# Altium PCB PB-PCB1.PcbDoc (part 4 of 4)
Units mm, origin at the board's own origin, x right, y up, seen from the top; angles counter-clockwise.
Board outline 179 x 85 mm, 2 copper layers (Top Layer, Bottom Layer); 468 components, 249 nets, 1291 pads, 562 vias.
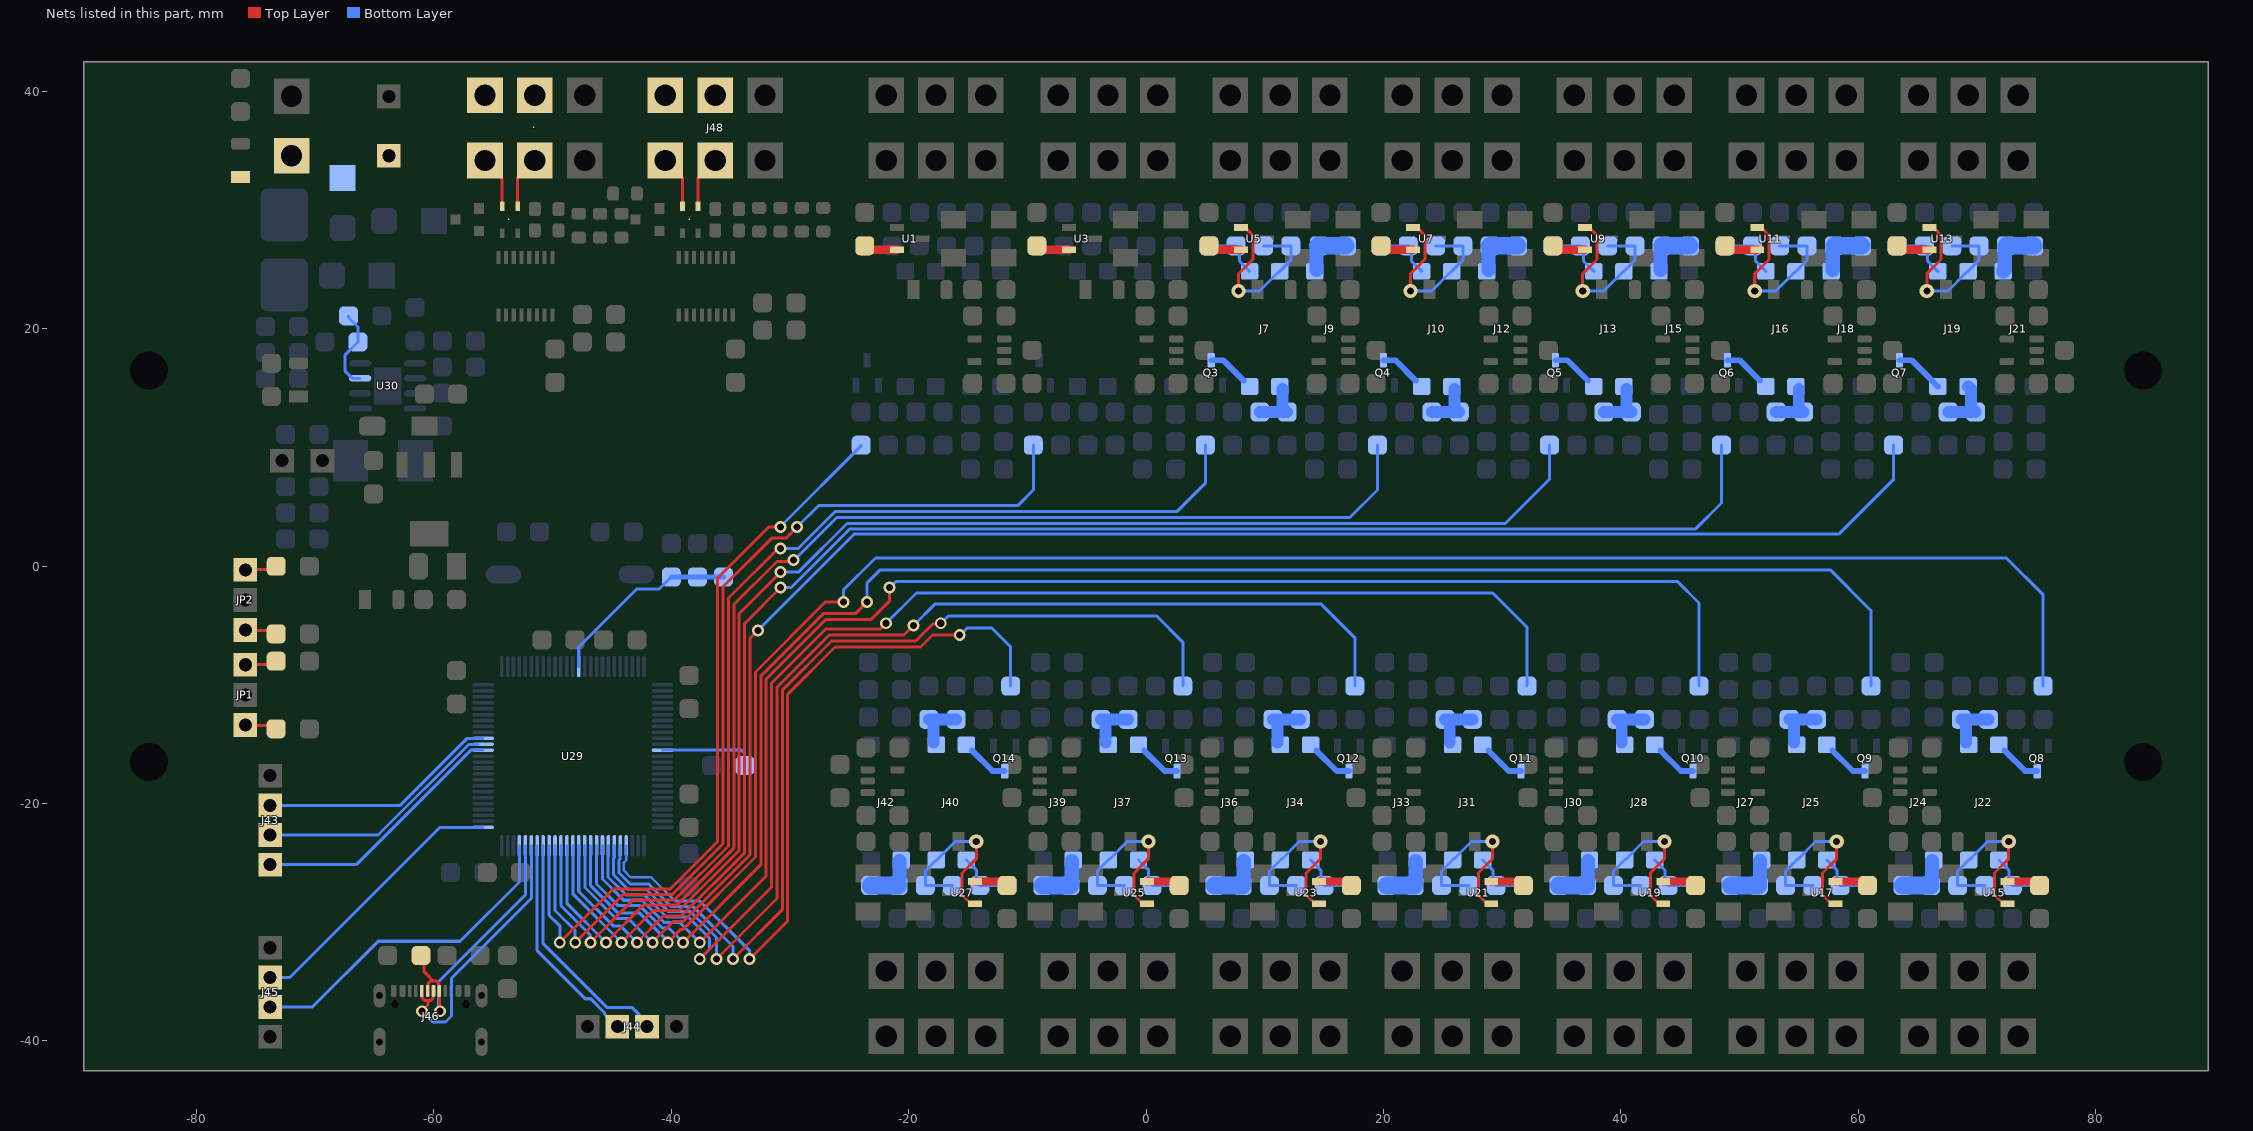
[diagram p3: the nets of this part, all layers, seen from the top]

## Via types
v1: diameter 1, hole 0.6, Top Layer to Bottom Layer, tented both sides, 509 vias
v2: diameter 1.2, hole 0.6, Top Layer to Bottom Layer, tented both sides, 39 vias
v3: diameter 1.27, hole 0.6, Top Layer to Bottom Layer, tented both sides, 14 vias

## Nets (pads, with @x,y where several pads share a name; then routed paths per layer and width w, separated by ;. In a path a pad name is that pad's centre, name@x,y a point inside that pad or via, vN(x,y) a via of type N, cw(c..) or ccw(c..) an arc to the next point about the centre after c; other vN are vias at no path point) (continued)
NetJ7_1: J7.1 R34.1 R35.1 | length 3.8
  Bottom Layer w1: R34.1@9.6,13 R35.1@11.9,13 ; R35.1@11.505,13.395 J7.1@11.505,14.945
NetJ7_2: J7.2 Q3.3 | length 3.5
  Bottom Layer w0.5: Q3.3@5.5,17.36 6.52,17.36 J7.2@8.245,15.635
NetJ7_3: J7.3 R36.1 R37.1 | length 4.9
  Bottom Layer w0.254: R36.1@5.3,27 R37.1@7.6,27 7.873,26.727 7.873,25.707 8.152,25.428 8.152,25.424 8.727,24.85 J7.3@8.73,24.85
NetJ7_4: J7.4 R32.2 R33.2 U5.1 | length 14.8
  Top Layer w0.254: v2(7.797,23.2) 7.797,24.651 8.997,25.851 8.997,27.903 U5.1@8.495,28.405
  Bottom Layer w0.254: v2(7.797,23.2) 9.573,23.2 J7.4@11.123,24.75 ; R32.2@9.9,27 R33.2@12.2,27 12.2,25.777 11.273,24.85 J7.4@11.27,24.85 J7.4@11.2,24.78
NetJ9_1: J9.1 R42.1 R43.1 | length 4.2
  Bottom Layer w1.2: J9.1@14.365,24.955 R42.1@14.365,26.865
  Bottom Layer w1.5: R42.1@14.5,27 R43.1@16.8,27
NetJ10_1: J10.1 R49.1 R50.1 | length 3.8
  Bottom Layer w1: R49.1@24.1,13 R50.1@26.4,13 ; R50.1@26.005,13.395 J10.1@26.005,14.945
NetJ10_2: J10.2 Q4.3 | length 3.5
  Bottom Layer w0.5: Q4.3@20,17.36 21.02,17.36 J10.2@22.745,15.635
NetJ10_3: J10.3 R51.1 R52.1 | length 4.9
  Bottom Layer w0.254: R51.1@19.8,27 R52.1@22.1,27 22.373,26.727 22.373,25.707 22.652,25.428 22.652,25.424 23.227,24.85 J10.3@23.23,24.85
NetJ10_4: J10.4 R47.2 R48.2 U7.1 | length 14.8
  Top Layer w0.254: v2(22.297,23.2) 22.297,24.651 23.497,25.851 23.497,27.903 U7.1@22.995,28.405
  Bottom Layer w0.254: v2(22.297,23.2) 24.073,23.2 J10.4@25.623,24.75 ; R47.2@24.4,27 R48.2@26.7,27 26.7,25.777 25.773,24.85 J10.4@25.77,24.85 J10.4@25.7,24.78
NetJ12_1: J12.1 R57.1 R58.1 | length 4.2
  Bottom Layer w1.2: J12.1@28.865,24.955 R57.1@28.865,26.865
  Bottom Layer w1.5: R57.1@29,27 R58.1@31.3,27
NetJ13_1: J13.1 R64.1 R65.1 | length 3.8
  Bottom Layer w1: R64.1@38.6,13 R65.1@40.9,13 ; R65.1@40.505,13.395 J13.1@40.505,14.945
NetJ13_2: J13.2 Q5.3 | length 3.5
  Bottom Layer w0.5: Q5.3@34.5,17.36 35.52,17.36 J13.2@37.245,15.635
NetJ13_3: J13.3 R66.1 R67.1 | length 4.9
  Bottom Layer w0.254: R66.1@34.3,27 R67.1@36.6,27 36.873,26.727 36.873,25.707 37.152,25.428 37.152,25.424 37.727,24.85 J13.3@37.73,24.85
NetJ13_4: J13.4 R62.2 R63.2 U9.1 | length 14.8
  Top Layer w0.254: v2(36.8,23.2) 36.8,24.651 38,25.851 38,27.903 U9.1@37.499,28.405
  Bottom Layer w0.254: v2(36.8,23.2) 38.577,23.2 J13.4@40.127,24.75 ; R62.2@38.9,27 R63.2@41.2,27 41.2,25.777 40.273,24.85 J13.4@40.27,24.85 J13.4@40.2,24.78
NetJ15_1: J15.1 R72.1 R73.1 | length 4.2
  Bottom Layer w1.2: J15.1@43.365,24.955 R72.1@43.365,26.865
  Bottom Layer w1.5: R72.1@43.5,27 R73.1@45.8,27
NetJ16_1: J16.1 R79.1 R80.1 | length 3.8
  Bottom Layer w1: R79.1@53.1,13 R80.1@55.4,13 ; R80.1@55.005,13.395 J16.1@55.005,14.945
NetJ16_2: J16.2 Q6.3 | length 3.5
  Bottom Layer w0.5: Q6.3@49,17.36 50.02,17.36 J16.2@51.745,15.635
NetJ16_3: J16.3 R81.1 R82.1 | length 4.9
  Bottom Layer w0.254: R81.1@48.8,27 R82.1@51.1,27 51.373,26.727 51.373,25.707 51.652,25.428 51.652,25.424 52.227,24.85 J16.3@52.23,24.85
NetJ16_4: J16.4 R77.2 R78.2 U11.1 | length 14.8
  Top Layer w0.254: v2(51.297,23.2) 51.297,24.651 52.497,25.851 52.497,27.903 U11.1@51.995,28.405
  Bottom Layer w0.254: v2(51.297,23.2) 53.073,23.2 J16.4@54.623,24.75 ; R77.2@53.4,27 R78.2@55.7,27 55.7,25.777 54.773,24.85 J16.4@54.77,24.85 J16.4@54.7,24.78
NetJ18_1: J18.1 R87.1 R88.1 | length 4.2
  Bottom Layer w1.2: J18.1@57.865,24.955 R87.1@57.865,26.865
  Bottom Layer w1.5: R87.1@58,27 R88.1@60.3,27
NetJ19_1: J19.1 R94.1 R95.1 | length 4.7
  Bottom Layer w1: R94.1@67.6,13 R95.1@69.9,13 69.505,13.395 69.505,14.945 69.3,15.15 J19.1@69.27,15.15
NetJ19_2: J19.2 Q7.3 | length 4.2
  Bottom Layer w0.5: Q7.3@63.5,17.36 64.52,17.36 66.245,15.635 66.245,15.605 66.7,15.15 J19.2@66.73,15.15
NetJ19_3: J19.3 R96.1 R97.1 | length 4.9
  Bottom Layer w0.254: R96.1@63.3,27 R97.1@65.6,27 65.873,26.727 65.873,25.707 66.152,25.428 66.152,25.424 66.727,24.85 J19.3@66.73,24.85
NetJ19_4: J19.4 R92.2 R93.2 U13.1 | length 14.9
  Top Layer w0.254: v2(65.8,23.2) 65.8,24.651 67,25.851 67,27.9 66.513,28.387 66.465,28.387 66.448,28.404 U13.1@66.448,28.452
  Bottom Layer w0.254: v2(65.8,23.2) 67.577,23.2 J19.4@69.127,24.75 ; R92.2@67.9,27 R93.2@70.2,27 70.2,25.777 69.273,24.85 J19.4@69.27,24.85 J19.4@69.2,24.78
NetJ21_1: J21.1 R102.1 R103.1 | length 4.6
  Bottom Layer w1.2: J21.1@72.23,24.85 72.26,24.85 72.365,24.955 72.365,26.865 R102.1@72.5,27
  Bottom Layer w1.5: R102.1@72.5,27 R103.1@74.8,27
NetJ22_1: J22.1 R109.1 R110.1 | length 3.8
  Bottom Layer w1: R110.1@68.7,-12.9 R109.1@71,-12.9 ; J22.1@69.095,-14.845 R110.1@69.095,-13.295
NetJ22_2: J22.2 Q8.3 | length 3.5
  Bottom Layer w0.5: J22.2@72.355,-15.535 74.08,-17.26 Q8.3@75.1,-17.26
NetJ22_3: J22.3 R111.1 R112.1 | length 4.9
  Bottom Layer w0.254: J22.3@71.87,-24.75 71.873,-24.75 72.448,-25.324 72.448,-25.328 72.727,-25.607 72.727,-26.627 R112.1@73,-26.9 R111.1@75.3,-26.9
NetJ22_4: J22.4 R107.2 R108.2 U15.1 | length 14.7
  Top Layer w0.254: U15.1@72.087,-28.287 71.5,-27.7 71.5,-25.851 72.7,-24.651 v2(72.7,-23.2)
  Bottom Layer w0.254: J22.4@69.373,-24.75 70.923,-23.2 v2(72.7,-23.2) ; J22.4@69.4,-24.68 J22.4@69.33,-24.75 69.327,-24.75 68.4,-25.677 R108.2@68.4,-26.9 R107.2@70.7,-26.9
NetJ24_1: J24.1 R117.1 R118.1 | length 4.2
  Bottom Layer w1.2: R117.1@66.235,-26.765 J24.1@66.235,-24.855
  Bottom Layer w1.5: R118.1@63.8,-26.9 R117.1@66.1,-26.9
NetJ25_1: J25.1 R124.1 R125.1 | length 3.8
  Bottom Layer w1: R125.1@54.2,-12.9 R124.1@56.5,-12.9 ; J25.1@54.595,-14.845 R125.1@54.595,-13.295
NetJ25_2: J25.2 Q9.3 | length 3.5
  Bottom Layer w0.5: J25.2@57.855,-15.535 59.58,-17.26 Q9.3@60.6,-17.26
NetJ25_3: J25.3 R126.1 R127.1 | length 4.9
  Bottom Layer w0.254: J25.3@57.37,-24.75 57.373,-24.75 57.948,-25.324 57.948,-25.328 58.227,-25.607 58.227,-26.627 R127.1@58.5,-26.9 R126.1@60.8,-26.9
NetJ25_4: J25.4 R122.2 R123.2 U17.1 | length 14.7
  Top Layer w0.254: U17.1@57.587,-28.287 57,-27.7 57,-25.851 58.2,-24.651 v2(58.2,-23.2)
  Bottom Layer w0.254: J25.4@54.873,-24.75 56.423,-23.2 v2(58.2,-23.2) ; J25.4@54.9,-24.68 J25.4@54.83,-24.75 54.827,-24.75 53.9,-25.677 R123.2@53.9,-26.9 R122.2@56.2,-26.9
NetJ27_1: J27.1 R132.1 R133.1 | length 4.2
  Bottom Layer w1.2: R132.1@51.735,-26.765 J27.1@51.735,-24.855
  Bottom Layer w1.5: R133.1@49.3,-26.9 R132.1@51.6,-26.9
NetJ28_1: J28.1 R139.1 R140.1 | length 3.8
  Bottom Layer w1: R140.1@39.7,-12.9 R139.1@42,-12.9 ; J28.1@40.095,-14.845 R140.1@40.095,-13.295
NetJ28_2: J28.2 Q10.3 | length 3.5
  Bottom Layer w0.5: J28.2@43.355,-15.535 45.08,-17.26 Q10.3@46.1,-17.26
NetJ28_3: J28.3 R141.1 R142.1 | length 4.9
  Bottom Layer w0.254: J28.3@42.87,-24.75 42.873,-24.75 43.448,-25.324 43.448,-25.328 43.727,-25.607 43.727,-26.627 R142.1@44,-26.9 R141.1@46.3,-26.9
NetJ28_4: J28.4 R137.2 R138.2 U19.1 | length 14.7
  Top Layer w0.254: U19.1@43.087,-28.287 42.5,-27.7 42.5,-25.851 43.7,-24.651 v2(43.7,-23.2)
  Bottom Layer w0.254: J28.4@40.373,-24.75 41.923,-23.2 v2(43.7,-23.2) ; J28.4@40.4,-24.68 J28.4@40.33,-24.75 40.327,-24.75 39.4,-25.677 R138.2@39.4,-26.9 R137.2@41.7,-26.9
NetJ30_1: J30.1 R147.1 R148.1 | length 4.2
  Bottom Layer w1.2: R147.1@37.235,-26.765 J30.1@37.235,-24.855
  Bottom Layer w1.5: R148.1@34.8,-26.9 R147.1@37.1,-26.9
NetJ31_1: J31.1 R154.1 R155.1 | length 3.8
  Bottom Layer w1: R155.1@25.2,-12.9 R154.1@27.5,-12.9 ; J31.1@25.595,-14.845 R155.1@25.595,-13.295
NetJ31_2: J31.2 Q11.3 | length 3.5
  Bottom Layer w0.5: J31.2@28.855,-15.535 30.58,-17.26 Q11.3@31.6,-17.26
NetJ31_3: J31.3 R156.1 R157.1 | length 4.9
  Bottom Layer w0.254: J31.3@28.37,-24.75 28.373,-24.75 28.948,-25.324 28.948,-25.328 29.227,-25.607 29.227,-26.627 R157.1@29.5,-26.9 R156.1@31.8,-26.9
NetJ31_4: J31.4 R152.2 R153.2 U21.1 | length 14.7
  Top Layer w0.254: U21.1@28.587,-28.287 28,-27.7 28,-25.851 29.2,-24.651 v2(29.2,-23.2)
  Bottom Layer w0.254: J31.4@25.873,-24.75 27.423,-23.2 v2(29.2,-23.2) ; J31.4@25.9,-24.68 J31.4@25.83,-24.75 25.827,-24.75 24.9,-25.677 R153.2@24.9,-26.9 R152.2@27.2,-26.9
NetJ33_1: J33.1 R162.1 R163.1 | length 4.2
  Bottom Layer w1.2: R162.1@22.735,-26.765 J33.1@22.735,-24.855
  Bottom Layer w1.5: R163.1@20.3,-26.9 R162.1@22.6,-26.9
NetJ34_1: J34.1 R169.1 R170.1 | length 3.8
  Bottom Layer w1: R170.1@10.7,-12.9 R169.1@13,-12.9 ; J34.1@11.095,-14.845 R170.1@11.095,-13.295
NetJ34_2: J34.2 Q12.3 | length 3.5
  Bottom Layer w0.5: J34.2@14.355,-15.535 16.08,-17.26 Q12.3@17.1,-17.26
NetJ34_3: J34.3 R171.1 R172.1 | length 4.9
  Bottom Layer w0.254: J34.3@13.87,-24.75 13.873,-24.75 14.448,-25.324 14.448,-25.328 14.727,-25.607 14.727,-26.627 R172.1@15,-26.9 R171.1@17.3,-26.9
NetJ34_4: J34.4 R167.2 R168.2 U23.1 | length 14.7
  Top Layer w0.254: U23.1@14.087,-28.287 13.5,-27.7 13.5,-25.851 14.7,-24.651 v2(14.7,-23.2)
  Bottom Layer w0.254: J34.4@11.373,-24.75 12.923,-23.2 v2(14.7,-23.2) ; J34.4@11.4,-24.68 J34.4@11.33,-24.75 11.327,-24.75 10.4,-25.677 R168.2@10.4,-26.9 R167.2@12.7,-26.9
NetJ36_1: J36.1 R177.1 R178.1 | length 4.2
  Bottom Layer w1.2: R177.1@8.235,-26.765 J36.1@8.235,-24.855
  Bottom Layer w1.5: R178.1@5.8,-26.9 R177.1@8.1,-26.9
NetJ37_1: J37.1 R184.1 R185.1 | length 3.8
  Bottom Layer w1: R185.1@-3.8,-12.9 R184.1@-1.5,-12.9 ; J37.1@-3.405,-14.845 R185.1@-3.405,-13.295
NetJ37_2: J37.2 Q13.3 | length 3.5
  Bottom Layer w0.5: J37.2@-0.145,-15.535 1.58,-17.26 Q13.3@2.6,-17.26
NetJ37_3: J37.3 R186.1 R187.1 | length 4.9
  Bottom Layer w0.254: J37.3@-0.63,-24.75 -0.627,-24.75 -0.052,-25.324 -0.052,-25.328 0.227,-25.607 0.227,-26.627 R187.1@0.5,-26.9 R186.1@2.8,-26.9
NetJ37_4: J37.4 R182.2 R183.2 U25.1 | length 14.7
  Top Layer w0.254: U25.1@-0.413,-28.287 -1,-27.7 -1,-25.851 0.2,-24.651 v2(0.2,-23.2)
  Bottom Layer w0.254: J37.4@-3.127,-24.75 -1.577,-23.2 v2(0.2,-23.2) ; J37.4@-3.1,-24.68 J37.4@-3.17,-24.75 -3.173,-24.75 -4.1,-25.677 R183.2@-4.1,-26.9 R182.2@-1.8,-26.9
NetJ39_1: J39.1 R192.1 R193.1 | length 4.2
  Bottom Layer w1.2: R192.1@-6.265,-26.765 J39.1@-6.265,-24.855
  Bottom Layer w1.5: R193.1@-8.7,-26.9 R192.1@-6.4,-26.9
NetJ40_1: J40.1 R199.1 R200.1 | length 3.8
  Bottom Layer w1: R200.1@-18.3,-12.9 R199.1@-16,-12.9 ; J40.1@-17.905,-14.845 R200.1@-17.905,-13.295
NetJ40_2: J40.2 Q14.3 | length 3.5
  Bottom Layer w0.5: J40.2@-14.645,-15.535 -12.92,-17.26 Q14.3@-11.9,-17.26
NetJ40_3: J40.3 R201.1 R202.1 | length 4.9
  Bottom Layer w0.254: J40.3@-15.13,-24.75 -15.127,-24.75 -14.552,-25.324 -14.552,-25.328 -14.273,-25.607 -14.273,-26.627 R202.1@-14,-26.9 R201.1@-11.7,-26.9
NetJ40_4: J40.4 R197.2 R198.2 U27.1 | length 15.2
  Top Layer w0.254: U27.1@-14.408,-28.44 -14.56,-28.287 -14.913,-28.287 -15.5,-27.7 -15.5,-25.851 -14.3,-24.651 v2(-14.3,-23.2)
  Bottom Layer w0.254: R197.2@-16.3,-26.9 R198.2@-18.6,-26.9 -18.6,-25.677 -17.673,-24.75 -17.627,-24.75 -16.077,-23.2 v2(-14.3,-23.2)
NetJ42_1: J42.1 R207.1 R208.1 | length 4.2
  Bottom Layer w1.2: R207.1@-20.765,-26.765 J42.1@-20.765,-24.855
  Bottom Layer w1.5: R208.1@-23.2,-26.9 R207.1@-20.9,-26.9
NetJ43_1: J43.1 U29.89 | length 21.9
  Bottom Layer w0.254: J43.1@-73.8,-25.15 -66.55,-25.15 -56.9,-15.5 U29.89@-55.85,-15.5
NetJ43_2: J43.2 U29.90 | length 20.7
  Bottom Layer w0.254: J43.2@-73.8,-22.65 -64.708,-22.65 -57.081,-15.023 U29.90@-56.3,-15.023
NetJ43_3: J43.3 U29.91 | length 20.3
  Bottom Layer w0.254: J43.3@-73.8,-20.15 -62.85,-20.15 -57.2,-14.5 U29.91@-55.85,-14.5
NetJ44_2: J44.2 U29.68 | length 20.1
  Bottom Layer w0.254: U29.68@-50.8,-23.55 -50.8,-31.8 -45.4,-37.2 -43.3,-37.2 -42.05,-38.45 J44.2@-42.05,-38.8
NetJ44_3: J44.3 U29.69 | length 18.3
  Bottom Layer w0.254: U29.69@-51.3,-23.55 -51.3,-32.392 -47.246,-36.446 -46.8,-36.446 -45.623,-37.623 -45.623,-37.727 J44.3@-44.55,-38.8
NetJ46_A6: J46.A6 J46.B6 R214.2 U29.71 | length 23.7
  Top Layer w0.254: R214.2@-61.1,-32.8 -60.827,-33.073 -60.827,-34.182 -60.056,-34.953 -60.04,-34.953 ; J46.A6@-60.54,-35.78 -60.517,-35.757 -60.517,-35.188 -60.282,-34.953 -60.04,-34.953 ; v1(-59.5,-37.5) -59.52,-37.48 -59.52,-35.8 -59.563,-35.757 -59.563,-35.188 -59.798,-34.953 -60.04,-34.953
  Bottom Layer w0.254: v1(-59.5,-37.5) -59.6,-37.4 -59.6,-35 -52.3,-27.7 U29.71@-52.3,-23.55
NetJ46_A7: J46.A7 J46.B7 U29.70 | length 23.7
  Top Layer w0.254: J46.B7@-61.04,-35.78 -61.017,-35.803 -61.017,-36.372 -60.782,-36.607 -60.54,-36.607 ; v1(-61,-37.5) -61,-37.483 -60.495,-36.978 -60.495,-36.652 -60.54,-36.607 ; J46.A7@-60.04,-35.78 -60.063,-35.803 -60.063,-36.372 -60.298,-36.607 -60.54,-36.607
  Bottom Layer w0.254: v1(-61,-37.5) -60.1,-38.4 -59.03,-38.4 -58.529,-37.898 -58.529,-34.729 -51.8,-28 U29.70@-51.8,-23.55
NetJ47_1: ..1@-55.7,39.691 ..4@-54.25,30.35 ..4@-55.7,34.191 | length 4.9
  Top Layer w0.254: ..4@-55.7,34.691 -55.7,34.1 -54.25,32.65 ..4@-54.25,30.35
NetJ47_2: ..2@-51.5,39.691 ..3@-52.95,30.35 ..5 | length 4.4
  Top Layer w0.254: ..3@-52.95,30.35 -52.95,32.741 ..5@-51.5,34.191
NetJ48_1: ..4@-39.05,30.35 J48.1 J48.4 | length 4.4
  Top Layer w0.254: J48.4@-40.5,34.191 -39.05,32.741 ..4@-39.05,30.35
NetJ48_2: ..3@-37.75,30.35 J48.2 J48.5 | length 4.4
  Top Layer w0.254: ..3@-37.75,30.35 -37.75,32.741 J48.5@-36.3,34.191
NetJP1_1: JP1.1 R213.1 | length 2.7
  Top Layer w0.254: JP1.1@-75.9,-13.38 -75.877,-13.404 -73.597,-13.404 R213.1@-73.3,-13.7
NetJP1_3: JP1.3 R215.1 | length 2.7
  Top Layer w0.254: JP1.3@-75.9,-8.3 -75.887,-8.287 -73.587,-8.287 R215.1@-73.3,-8
NetJP2_1: JP2.1 R216.1 | length 2.7
  Top Layer w0.254: JP2.1@-75.9,-5.38 -75.877,-5.403 -73.597,-5.403 R216.1@-73.3,-5.7
NetJP2_3: JP2.3 R217.1 | length 2.7
  Top Layer w0.254: JP2.3@-75.9,-0.3 -75.887,-0.287 -73.587,-0.287 R217.1@-73.3,0
NetR1_2: R1.2 U1.2 | length 3
  Top Layer w0.254: R1.2@-23.7,26.66 R1.2@-23.7,27
  Top Layer w0.7: R1.2@-23.7,26.66 U1.2@-20.992,26.66
NetR8_1: R8.1 U29.67 | length 64.3
  Top Layer w0.254: v1(-49.4,-31.7) -44.9,-27.2 -40.1,-27.2 -36.092,-23.192 -36.092,-0.992 -31.808,3.292 -30.808,3.292 v1(-30.8,3.3)
  Bottom Layer w0.254: U29.67@-50.3,-23.55 -50.301,-29.399 -49.4,-30.3 v1(-49.4,-31.7) ; v1(-30.8,3.3) -30.8,3.35 -24,10.15 R8.1@-24,10.2
NetR16_2: R16.2 U3.2 | length 3
  Top Layer w0.254: R16.2@-9.2,26.66 R16.2@-9.2,27
  Top Layer w0.7: R16.2@-9.2,26.66 U3.2@-6.492,26.66
NetR23_1: R23.1 U29.66 | length 79.7
  Top Layer w0.254: v1(-48.1,-31.7) -44.054,-27.654 -40.128,-27.654 -39.912,-27.654 -35.638,-23.38 -35.638,-1.738 -31.5,2.4 -30.3,2.4 v1(-29.4,3.3)
  Bottom Layer w0.254: U29.66@-49.8,-23.55 -49.8,-29 -48.1,-30.7 v1(-48.1,-31.7) ; v1(-29.4,3.3) -27.6,5.1 -10.816,5.1 -9.5,6.416 R23.1@-9.5,10.2
NetR31_2: R31.2 U5.2 | length 3
  Top Layer w0.254: R31.2@5.3,26.66 R31.2@5.3,27
  Top Layer w0.7: R31.2@5.3,26.66 U5.2@8.008,26.66
NetR38_1: R38.1 U29.65 | length 92.7
  Top Layer w0.254: v1@-46.972,-31.872 -43.208,-28.108 -39.94,-28.108 -39.724,-28.108 -35.184,-23.568 -35.184,-2.684 -31,1.5 v1(-30.8,1.5)
  Bottom Layer w0.254: U29.65@-49.3,-23.55 -49.3,-28.6 -46.869,-31.031 -46.869,-31.631 v1(-46.8,-31.7) ; v1(-30.8,1.5) -29.3,1.5 -26.2,4.6 2.6,4.6 5,7 R38.1@5,10.2
NetR46_2: R46.2 U7.2 | length 3
  Top Layer w0.254: R46.2@19.8,26.66 R46.2@19.8,27
  Top Layer w0.7: R46.2@19.8,26.66 U7.2@22.508,26.66
NetR53_1: R53.1 U29.64 | length 106.1
  Top Layer w0.254: v1(-45.5,-31.7) -42.362,-28.562 -39.752,-28.562 -39.536,-28.562 -34.73,-23.756 -34.73,-23.54 -34.73,-3.23 -31.1,0.4 -29.827,0.4 v1(-29.7,0.527)
  Bottom Layer w0.254: U29.64@-48.8,-23.55 -48.8,-28.4 v1(-45.5,-31.7) ; v1(-29.7,0.527) -29.631,0.527 -26.058,4.1 17.181,4.1 19.5,6.419 R53.1@19.5,10.2
NetR61_2: R61.2 U9.2 | length 3
  Top Layer w0.254: R61.2@34.3,26.66 R61.2@34.3,27
  Top Layer w0.7: R61.2@34.3,26.66 U9.2@37.008,26.66
NetR68_1: R68.1 U29.63 | length 118.8
  Top Layer w0.254: v1(-44.2,-31.7) -41.516,-29.016 -39.348,-29.016 -34.276,-23.944 -34.276,-3.976 v1(-30.8,-0.5)
  Bottom Layer w0.254: U29.63@-48.3,-23.55 -48.3,-27.6 v1(-44.2,-31.7) ; v1(-30.8,-0.5) -29.3,-0.5 -25.192,3.608 30.278,3.608 34,7.33 R68.1@34,10.2
NetR76_2: R76.2 U11.2 | length 3
  Top Layer w0.254: R76.2@48.8,26.66 R76.2@48.8,27
  Top Layer w0.7: R76.2@48.8,26.66 U11.2@51.508,26.66
NetR83_1: R83.1 U29.62 | length 133.5
  Top Layer w0.254: v1(-42.9,-31.7) -40.67,-29.47 -39.16,-29.47 -33.822,-24.132 -33.822,-4.822 v1(-30.8,-1.8)
  Bottom Layer w0.254: U29.62@-47.8,-23.55 -47.8,-27.4 -44.9,-30.3 -44.3,-30.3 v1(-42.9,-31.7) ; v1(-30.8,-1.8) -29.9,-1.8 -24.946,3.154 46.323,3.154 48.5,5.33 R83.1@48.5,10.2
NetR91_2: R91.2 U13.2 | length 3
  Top Layer w0.254: R91.2@63.3,26.66 R91.2@63.3,27
  Top Layer w0.7: R91.2@63.3,26.66 U13.2@66.008,26.66
NetR98_1: R98.1 U29.61 | length 145.5
  Top Layer w0.254: v1(-41.6,-31.7) -39.824,-29.924 -38.972,-29.924 -33.368,-24.32 -33.368,-6.068 v1(-32.7,-5.4)
  Bottom Layer w0.254: U29.61@-47.3,-23.55 -47.3,-24.312 -47.277,-24.335 -47.277,-27.079 -44.656,-29.7 -43.6,-29.7 v1(-41.6,-31.7) ; v1(-32.7,-5.4) -24.6,2.7 58.37,2.7 63,7.33 R98.1@63,10.2
NetR106_2: R106.2 U15.2 | length 3
  Top Layer w0.254: R106.2@75.3,-26.9 R106.2@75.3,-26.56
  Top Layer w0.7: U15.2@72.592,-26.56 R106.2@75.3,-26.56
NetR113_1: R113.1 U29.60 | length 159.9
  Top Layer w0.254: v1(-40.3,-31.7) -39.2,-30.6 -39.006,-30.6 -32.914,-24.508 -32.914,-8.914 -27,-3 v1(-25.5,-3)
  Bottom Layer w0.254: U29.60@-46.8,-23.55 -46.8,-26.914 -44.514,-29.2 -42.693,-29.2 -40.3,-31.593 v1(-40.3,-31.7) ; v1(-25.5,-3) -25.5,-2 -22.8,0.7 72.5,0.7 75.6,-2.4 R113.1@75.6,-10.1
NetR121_2: R121.2 U17.2 | length 3
  Top Layer w0.254: R121.2@60.8,-26.9 R121.2@60.8,-26.56
  Top Layer w0.7: U17.2@58.092,-26.56 R121.2@60.8,-26.56
NetR128_1: R128.1 U29.59 | length 143.7
  Top Layer w0.254: v1(-39,-31.7) -32.46,-25.16 -32.46,-9.26 -27.2,-4 -24.5,-4 v1(-23.5,-3)
  Bottom Layer w0.254: U29.59@-46.3,-23.55 -46.3,-26.772 -44.472,-28.6 -42.651,-28.6 -40.783,-30.468 -40.232,-30.468 v1(-39,-31.7) ; v1(-23.5,-3) -23.5,-1.4 -22.4,-0.3 57.658,-0.3 61.1,-3.742 R128.1@61.1,-10.1
NetR136_2: R136.2 U19.2 | length 3
  Top Layer w0.254: R136.2@46.3,-26.9 R136.2@46.3,-26.56
  Top Layer w0.7: U19.2@43.592,-26.56 R136.2@46.3,-26.56
NetR143_1: R143.1 U29.58 | length 128.1
  Top Layer w0.254: v1(-37.6,-31.7) -32.006,-26.106 -32.006,-9.506 -27,-4.5 -23.2,-4.5 -21.6,-2.9 v1(-21.6,-1.8)
  Bottom Layer w0.254: U29.58@-45.8,-23.55 -45.8,-26.361 -44.015,-28.146 -42.463,-28.146 -40.595,-30.014 -39.286,-30.014 v1(-37.6,-31.7) ; v1(-21.6,-1.8) -21.578,-1.8 -21.078,-1.3 44.8,-1.3 46.6,-3.1 R143.1@46.6,-10.1
NetR151_2: R151.2 U21.2 | length 3
  Top Layer w0.254: R151.2@31.8,-26.9 R151.2@31.8,-26.56
  Top Layer w0.7: U21.2@29.092,-26.56 R151.2@31.8,-26.56
NetR158_1: R158.1 U29.57 | length 114.2
  Top Layer w0.254: v1(-37.6,-33.1) -31.552,-27.052 -31.552,-9.852 -27,-5.3 -22.422,-5.3 -21.922,-4.8 v1(-21.9,-4.8)
  Bottom Layer w0.254: U29.57@-45.3,-23.55 -45.309,-23.559 -45.309,-24.389 -45.335,-24.416 -45.335,-26.184 -43.827,-27.692 -42.275,-27.692 -40.407,-29.56 -38.57,-29.56 -36.773,-31.357 -36.773,-32.273 v1(-37.6,-33.1) ; v1(-21.9,-4.8) -19.346,-2.246 29.216,-2.246 32.1,-5.13 R158.1@32.1,-10.1
NetR166_2: R166.2 U23.2 | length 3
  Top Layer w0.254: R166.2@17.3,-26.9 R166.2@17.3,-26.56
  Top Layer w0.7: U23.2@14.592,-26.56 R166.2@17.3,-26.56
NetR173_1: R173.1 U29.56 | length 97
  Top Layer w0.254: v1(-36.2,-33.1) -31.098,-27.998 -31.098,-10.198 -26.7,-5.8 -20.4,-5.8 v1(-19.6,-5)
  Bottom Layer w0.254: U29.56@-44.8,-23.55 -44.809,-23.559 -44.809,-24.532 -44.881,-24.604 -44.881,-24.952 -44.881,-25.996 -43.639,-27.238 -42.087,-27.238 -40.219,-29.106 -38.382,-29.106 -36.2,-31.288 v1(-36.2,-33.1) ; v1(-19.6,-5) -17.8,-3.2 14.776,-3.2 17.6,-6.024 R173.1@17.6,-10.1
NetR181_2: R181.2 U25.2 | length 3
  Top Layer w0.254: R181.2@2.8,-26.9 R181.2@2.8,-26.56
  Top Layer w0.7: U25.2@0.092,-26.56 R181.2@2.8,-26.56
NetR188_1: R188.1 U29.55 | length 80.9
  Top Layer w0.254: v1(-34.8,-33.1) -30.644,-28.944 -30.644,-10.444 -26.5,-6.3 -19.4,-6.3 -17.969,-4.869 -17.369,-4.869 v1(-17.3,-4.8)
  Bottom Layer w0.254: U29.55@-44.3,-23.55 -44.309,-23.559 -44.309,-24.674 -44.427,-24.792 -44.427,-25.808 -43.451,-26.784 -41.899,-26.784 -40.031,-28.652 -38.194,-28.652 -34.8,-32.046 v1(-34.8,-33.1) ; v1(-17.3,-4.8) -17.254,-4.8 -16.654,-4.2 0.9,-4.2 3.1,-6.4 R188.1@3.1,-10.1
NetR196_2: R196.2 U27.2 | length 3
  Top Layer w0.254: R196.2@-11.7,-26.9 R196.2@-11.7,-26.56
  Top Layer w0.7: U27.2@-14.408,-26.56 R196.2@-11.7,-26.56
NetR203_1: R203.1 U29.54 | length 65
  Top Layer w0.254: v1(-33.4,-33.1) -30.19,-29.89 -30.19,-10.79 -26.2,-6.8 -19,-6.8 -18,-5.8 v1(-15.7,-5.8)
  Bottom Layer w0.2: U29.54@-43.8,-23.55 -43.8,-24.769 -44,-24.969 -44,-25.631 -43.431,-26.2 -41.7,-26.2 -39.7,-28.2
  Bottom Layer w0.25: -39.7,-28.2 -37.6,-28.2 -33.4,-32.4 v1(-33.4,-33.1)
  Bottom Layer w0.254: v1(-15.7,-5.8) -15.654,-5.8 -15.054,-5.2 -13,-5.2 -11.4,-6.8 R203.1@-11.4,-10.1
NetR211_1: R211.1 U29.37 | length 8.1
  Bottom Layer w0.254: U29.37@-40.75,-15.5 -34.1,-15.5 -33.832,-15.768 -33.832,-16.768 R211.1@-33.8,-16.8
NetR222_2: ..1@-67.2,21.1 R222.2 U30.3 | length 7
  Bottom Layer w0.254: ..1@-67.2,21.1 -67.2,20.952 -66.4,20.152 R222.2@-66.4,18.9 -67.48,17.82 -67.48,16.433 -66.882,15.835 U30.3@-66.216,15.835
Pin: C56.1 D43.1 D46.1 POWER1.2
RESET: C46.2 C47.2 R212.1 U29.14 | length 16.3
  Bottom Layer w0.254: U29.14@-47.8,-8.45 -47.8,-6.8 -42.9,-1.9 -41,-1.9 C46.2@-40,-0.9
  Bottom Layer w0.4: C46.2@-40,-0.9 C47.2@-37.8,-0.9 R212.1@-35.6,-0.9
SWD_CLK: J45.3 U29.76 | length 23.2
  Bottom Layer w0.254: J45.3@-73.8,-34.65 -72.15,-34.65 -59.5,-22 U29.76@-55.85,-22
SWD_IO: J45.2 U29.72 | length 28.4
  Bottom Layer w0.254: J45.2@-73.8,-37.15 -70.25,-37.15 -64.7,-31.6 -57.8,-31.6 -52.8,-26.6 U29.72@-52.8,-23.55
pads on no net: B1.2 B1.3 B1.13 B1.16 B2.2 B2.3 B2.13 B2.16 J46. J46.A5 J46.A8 J46.B5 J46.B8 J46.SH1 J46.SH2 J46.SH3 J46.SH4 U29.6 U29.7 U29.8 U29.9 U29.33 U29.34 U29.38 U29.39 U29.40 U29.53 U29.77 U29.78 U29.79 U29.80 U29.83 U29.84 U29.85 U29.86 U29.87 U29.88 U29.92 U29.95 U29.96 U29.97 U30.4

## Polygon pours and split planes (outlines as drawn)
MCUGND on Top Layer "MCUGND_L01_P451" (solid, remove dead copper, pour order 451): -25.5,41.6 80.3,41.6 80.3,-41.5 -25.5,-41.5
24vMCU2 on Top Layer "24VMCU2_L01_P394" (solid, remove dead copper, pour order 394): 67.1,41.4 70.8,41.4 70.8,36.1 67.4,36.1 67.4,29.8 62.3,29.8 62.3,32 67.1,32
24vMCU2 on Top Layer "24VMCU2_L01_P366" (solid, remove dead copper, pour order 366): 9.1,41.4 12.8,41.4 12.8,36.1 9.4,36.1 9.4,29.8 4.3,29.8 4.3,32 9.1,32
MCUGND on Top Layer "NONET_L01_P-001" (solid, remove dead copper, pour order 345): -58.8,37.8 -59.4,37.2 -59.4,23.1 -25,23.1 -25,-42.4 -79,-42.4 -79,37.8
24vMCU2 on Top Layer "24VMCU2_L01_P443" (solid, remove dead copper, pour order 443): -15.5,-41.318 -19.2,-41.318 -19.2,-36 -15.8,-36 -15.8,-29.718 -10.7,-29.718 -10.7,-31.918 -15.5,-31.918
MCUGND on Top Layer "MCUGND_L01_P439" (solid, remove dead copper, pour order 439): -12,-41.118 -15,-41.118 -15,-32.618 -12,-32.618
NetD41_A on Top Layer "NETD41_A_L01_P438" (solid, remove dead copper, pour order 438): -20.4,-41.118 -24.7,-41.118 -24.7,-21.018 -23.8,-21.018 -23.8,-38.018 -20.4,-38.018
NetD40_1 on Top Layer "NETD40_1_L01_P437" (solid, remove dead copper, pour order 437): -16.2,-35.618 -19.2,-35.618 -19.2,-25.918 -16.2,-25.918
24vMCU2 on Top Layer "24VMCU2_L01_P436" (solid, remove dead copper, pour order 436): -1,-41.318 -4.7,-41.318 -4.7,-36 -1.3,-36 -1.3,-29.718 3.8,-29.718 3.8,-31.918 -1,-31.918
MCUGND on Top Layer "MCUGND_L01_P432" (solid, remove dead copper, pour order 432): 2.5,-41.118 -0.5,-41.118 -0.5,-32.618 2.5,-32.618
NetD38_A on Top Layer "NETD38_A_L01_P431" (solid, remove dead copper, pour order 431): -5.9,-41.118 -10.2,-41.118 -10.2,-21.018 -9.3,-21.018 -9.3,-38.018 -5.9,-38.018
NetD37_1 on Top Layer "NETD37_1_L01_P430" (solid, remove dead copper, pour order 430): -1.7,-35.618 -4.7,-35.618 -4.7,-25.918 -1.7,-25.918
24vMCU2 on Top Layer "24VMCU2_L01_P429" (solid, remove dead copper, pour order 429): 13.5,-41.318 9.8,-41.318 9.8,-36 13.2,-36 13.2,-29.718 18.3,-29.718 18.3,-31.918 13.5,-31.918
MCUGND on Top Layer "MCUGND_L01_P425" (solid, remove dead copper, pour order 425): 17,-41.118 14,-41.118 14,-32.618 17,-32.618
NetD35_A on Top Layer "NETD35_A_L01_P424" (solid, remove dead copper, pour order 424): 8.6,-41.118 4.3,-41.118 4.3,-21.018 5.2,-21.018 5.2,-38.018 8.6,-38.018
NetD34_1 on Top Layer "NETD34_1_L01_P423" (solid, remove dead copper, pour order 423): 12.8,-35.618 9.8,-35.618 9.8,-25.918 12.8,-25.918
24vMCU2 on Top Layer "24VMCU2_L01_P422" (solid, remove dead copper, pour order 422): 28,-41.318 24.3,-41.318 24.3,-36 27.7,-36 27.7,-29.718 32.8,-29.718 32.8,-31.918 28,-31.918
MCUGND on Top Layer "MCUGND_L01_P418" (solid, remove dead copper, pour order 418): 31.5,-41.118 28.5,-41.118 28.5,-32.618 31.5,-32.618
NetD32_A on Top Layer "NETD32_A_L01_P417" (solid, remove dead copper, pour order 417): 23.1,-41.118 18.8,-41.118 18.8,-21.018 19.7,-21.018 19.7,-38.018 23.1,-38.018
NetD31_1 on Top Layer "NETD31_1_L01_P416" (solid, remove dead copper, pour order 416): 27.3,-35.618 24.3,-35.618 24.3,-25.918 27.3,-25.918
24vMCU2 on Top Layer "24VMCU2_L01_P415" (solid, remove dead copper, pour order 415): 42.5,-41.318 38.8,-41.318 38.8,-36 42.2,-36 42.2,-29.718 47.3,-29.718 47.3,-31.918 42.5,-31.918
MCUGND on Top Layer "MCUGND_L01_P411" (solid, remove dead copper, pour order 411): 46,-41.118 43,-41.118 43,-32.618 46,-32.618
NetD29_A on Top Layer "NETD29_A_L01_P410" (solid, remove dead copper, pour order 410): 37.6,-41.118 33.3,-41.118 33.3,-21.018 34.2,-21.018 34.2,-38.018 37.6,-38.018
NetD28_1 on Top Layer "NETD28_1_L01_P409" (solid, remove dead copper, pour order 409): 41.8,-35.618 38.8,-35.618 38.8,-25.918 41.8,-25.918
24vMCU2 on Top Layer "24VMCU2_L01_P408" (solid, remove dead copper, pour order 408): 57,-41.318 53.3,-41.318 53.3,-36 56.7,-36 56.7,-29.718 61.8,-29.718 61.8,-31.918 57,-31.918
MCUGND on Top Layer "MCUGND_L01_P404" (solid, remove dead copper, pour order 404): 60.5,-41.118 57.5,-41.118 57.5,-32.618 60.5,-32.618
NetD26_A on Top Layer "NETD26_A_L01_P403" (solid, remove dead copper, pour order 403): 52.1,-41.118 47.8,-41.118 47.8,-21.018 48.7,-21.018 48.7,-38.018 52.1,-38.018
NetD25_1 on Top Layer "NETD25_1_L01_P402" (solid, remove dead copper, pour order 402): 56.3,-35.618 53.3,-35.618 53.3,-25.918 56.3,-25.918
24vMCU2 on Top Layer "24VMCU2_L01_P401" (solid, remove dead copper, pour order 401): 71.5,-41.318 67.8,-41.318 67.8,-36 71.2,-36 71.2,-29.718 76.3,-29.718 76.3,-31.918 71.5,-31.918
MCUGND on Top Layer "MCUGND_L01_P397" (solid, remove dead copper, pour order 397): 75,-41.118 72,-41.118 72,-32.618 75,-32.618
NetD23_A on Top Layer "NETD23_A_L01_P396" (solid, remove dead copper, pour order 396): 66.6,-41.118 62.3,-41.118 62.3,-21.018 63.2,-21.018 63.2,-38.018 66.6,-38.018
NetD22_1 on Top Layer "NETD22_1_L01_P395" (solid, remove dead copper, pour order 395): 70.8,-35.618 67.8,-35.618 67.8,-25.918 70.8,-25.918
MCUGND on Top Layer "MCUGND_L01_P390" (solid, remove dead copper, pour order 390): 63.6,41.2 66.6,41.2 66.6,32.7 63.6,32.7
NetD20_A on Top Layer "NETD20_A_L01_P389" (solid, remove dead copper, pour order 389): 72,41.2 76.3,41.2 76.3,21.1 75.4,21.1 75.4,38.1 72,38.1
NetD19_1 on Top Layer "NETD19_1_L01_P388" (solid, remove dead copper, pour order 388): 67.8,35.7 70.8,35.7 70.8,26 67.8,26
24vMCU2 on Top Layer "24VMCU2_L01_P387" (solid, remove dead copper, pour order 387): 52.6,41.4 56.3,41.4 56.3,36.1 52.9,36.1 52.9,29.8 47.8,29.8 47.8,32 52.6,32
MCUGND on Top Layer "MCUGND_L01_P383" (solid, remove dead copper, pour order 383): 49.1,41.2 52.1,41.2 52.1,32.7 49.1,32.7
NetD17_A on Top Layer "NETD17_A_L01_P382" (solid, remove dead copper, pour order 382): 57.5,41.2 61.8,41.2 61.8,21.1 60.9,21.1 60.9,38.1 57.5,38.1
NetD16_1 on Top Layer "NETD16_1_L01_P381" (solid, remove dead copper, pour order 381): 53.3,35.7 56.3,35.7 56.3,26 53.3,26
24vMCU2 on Top Layer "24VMCU2_L01_P380" (solid, remove dead copper, pour order 380): 38.1,41.4 41.8,41.4 41.8,36.1 38.4,36.1 38.4,29.8 33.3,29.8 33.3,32 38.1,32
MCUGND on Top Layer "MCUGND_L01_P376" (solid, remove dead copper, pour order 376): 34.6,41.2 37.6,41.2 37.6,32.7 34.6,32.7
NetD14_A on Top Layer "NETD14_A_L01_P375" (solid, remove dead copper, pour order 375): 43,41.2 47.3,41.2 47.3,21.1 46.4,21.1 46.4,38.1 43,38.1
NetD13_1 on Top Layer "NETD13_1_L01_P374" (solid, remove dead copper, pour order 374): 38.8,35.7 41.8,35.7 41.8,26 38.8,26
24vMCU2 on Top Layer "24VMCU2_L01_P373" (solid, remove dead copper, pour order 373): 23.6,41.4 27.3,41.4 27.3,36.1 24,36.1 24,29.8 18.8,29.8 18.8,32 23.6,32
MCUGND on Top Layer "MCUGND_L01_P369" (solid, remove dead copper, pour order 369): 20.1,41.2 23.1,41.2 23.1,32.7 20.1,32.7
NetD11_A on Top Layer "NETD11_A_L01_P368" (solid, remove dead copper, pour order 368): 28.5,41.2 32.8,41.2 32.8,21.1 31.9,21.1 31.9,38.1 28.5,38.1
NetD10_1 on Top Layer "NETD10_1_L01_P367" (solid, remove dead copper, pour order 367): 24.3,35.7 27.3,35.7 27.3,26 24.3,26
MCUGND on Top Layer "MCUGND_L01_P362" (solid, remove dead copper, pour order 362): 5.6,41.2 8.6,41.2 8.6,32.7 5.6,32.7
NetD8_A on Top Layer "NETD8_A_L01_P361" (solid, remove dead copper, pour order 361): 14,41.2 18.3,41.2 18.3,21.1 17.4,21.1 17.4,38.1 14,38.1
NetD7_1 on Top Layer "NETD7_1_L01_P360" (solid, remove dead copper, pour order 360): 9.8,35.7 12.8,35.7 12.8,26 9.8,26
24vMCU2 on Top Layer "24VMCU2_L01_P359" (solid, remove dead copper, pour order 359): -5.4,41.4 -1.7,41.4 -1.7,36.1 -5.1,36.1 -5.1,29.8 -10.2,29.8 -10.2,32 -5.4,32
MCUGND on Top Layer "MCUGND_L01_P355" (solid, remove dead copper, pour order 355): -8.9,41.2 -5.9,41.2 -5.9,32.7 -8.9,32.7
NetD5_A on Top Layer "NETD5_A_L01_P354" (solid, remove dead copper, pour order 354): -0.5,41.2 3.8,41.2 3.8,21.1 2.9,21.1 2.9,38.1 -0.5,38.1
NetD4_1 on Top Layer "NETD4_1_L01_P353" (solid, remove dead copper, pour order 353): -4.7,35.7 -1.7,35.7 -1.7,26 -4.7,26
24vMCU2 on Top Layer "24VMCU2_L01_P352" (solid, remove dead copper, pour order 352): -20,41.4 -16.2,41.4 -16.2,36.1 -19.5,36.1 -19.5,29.8 -24.7,29.8 -24.7,32 -20,32
MCUGND on Top Layer "MCUGND_L01_P348" (solid, remove dead copper, pour order 348): -23.4,41.2 -20.4,41.2 -20.4,32.7 -23.4,32.7
24vMCU2 on Top Layer "NONET_L01_P-001" (solid, remove dead copper, pour order 338): -70.7,26.5 -70.7,21.4 -58.3,21.4 -56.8,22.9 -56.8,24.2 -67.4,24.2 -69.7,26.5
NetD2_A on Top Layer "NETD2_A_L01_P306" (solid, remove dead copper, pour order 306): -15,41.2 -10.7,41.2 -10.7,21.1 -11.6,21.1 -11.6,38.1 -15,38.1
NetD1_1 on Top Layer "NETD1_1_L01_P304" (solid, remove dead copper, pour order 304): -19.2,35.7 -16.2,35.7 -16.2,26 -19.2,26
MGND on Top Layer "MGND_L01_P268" (solid, remove dead copper, pour order 268): -48.8,42.5 -48.8,32.1 -42.9,32.1 -42.9,42.5
NetJ47_1 on Top Layer "NETJ47_1_L01_P267" (solid, remove dead copper, pour order 267): -57.2,42.5 -57.2,32.1 -54.2,32.1 -54.2,42.5
NetJ47_2 on Top Layer "NETJ47_2_L01_P266" (solid, remove dead copper, pour order 266): -53,42.5 -53,32.1 -50,32.1 -50,42.5
MGND on Top Layer "MGND_L01_P265" (solid, remove dead copper, pour order 265): -33.6,42.5 -33.6,32.1 -26.6,32.1 -26.6,42.5
NetJ48_1 on Top Layer "NETJ48_1_L01_P264" (solid, remove dead copper, pour order 264): -42,42.5 -42,32.1 -39,32.1 -39,42.5
NetJ48_2 on Top Layer "NETJ48_2_L01_P263" (solid, remove dead copper, pour order 263): -37.8,42.5 -37.8,32.1 -34.8,32.1 -34.8,42.5
MCUGND on Top Layer "MCUGND_L01_P220" (solid, remove dead copper, pour order 220): -79,42.4 -58.7,42.4 -58.7,37.2 -79,37.2
5vMCU on Top Layer "5VMCU_L01_P222" (solid, remove dead copper, pour order 222): -69.4,12.6 -69.4,8.3 -62.2,8.3 -62.2,12.6
3v3MCU on Top Layer "3V3MCU_L01_P223" (solid, remove dead copper, pour order 223): -61.8,15.4 -59.7,15.4 -59.7,7 -58.8,7 -58.8,1.7 -60.6,1.7 -60.6,-1.4 -62.1,-1.4 -62.1,1.7 -63.9,1.7 -63.9,7 -61.8,7
Pin on Top Layer "PIN_L01_P221" (solid, remove dead copper, pour order 221): -77.4,33.1 -75.2,33.1 -75.2,36.5 -62.9,36.5 -62.9,32.3 -77.4,32.3
MCUGND on Bottom Layer "MCUGND_L02_P450" (solid, remove dead copper, pour order 450): -29.2,42.1 81.5,42.1 81.5,-42.1 -29.2,-42.1
MCUGND on Bottom Layer "NONET_L01_P-001" (solid, remove dead copper, pour order 347): -24.5,30.8 -79,30.8 -79,-42.5 -24.5,-42.5
24vMCU2 on Bottom Layer "24VMCU2_L02_P449" (solid, remove dead copper, pour order 449): -27.6,39.691 81.5,39.691 81.5,-39.609 -23.4,-39.609 -23.4,-36 79.2,-36 79.2,36.091 -25,36.091 -25,29.2 -27.6,29.2
MCUGND on Bottom Layer "MCUGND_L02_P219" (solid, remove dead copper, pour order 219): -62,42.5 -58.7,42.5 -58.7,21.2 -62.6,21.2 -62.6,12.1 -73.9,12.1 -73.9,13.8 -64.976,13.8 -64.976,26.4 -62,26.4
com14 on Bottom Layer "COM14_L02_P442" (solid, remove dead copper, pour order 442): -20.4,-35.618 -23.4,-35.618 -23.4,-29.118 -20.4,-29.118
24vMCU2 on Bottom Layer "24VMCU2_L02_P441" (solid, remove dead copper, pour order 441): -15.4,-41.118 -20,-41.118 -20,-29.118 -15.4,-29.118
MCUGND on Bottom Layer "MCUGND_L02_P440" (solid, remove dead copper, pour order 440): -12,-35.518 -15,-35.518 -15,-29.118 -12,-29.118
com13 on Bottom Layer "COM13_L02_P435" (solid, remove dead copper, pour order 435): -5.9,-35.618 -8.9,-35.618 -8.9,-29.118 -5.9,-29.118
24vMCU2 on Bottom Layer "24VMCU2_L02_P434" (solid, remove dead copper, pour order 434): -0.9,-41.118 -5.5,-41.118 -5.5,-29.118 -0.9,-29.118
MCUGND on Bottom Layer "MCUGND_L02_P433" (solid, remove dead copper, pour order 433): 2.5,-35.518 -0.5,-35.518 -0.5,-29.118 2.5,-29.118
com12 on Bottom Layer "COM12_L02_P428" (solid, remove dead copper, pour order 428): 8.6,-35.618 5.6,-35.618 5.6,-29.118 8.6,-29.118
24vMCU2 on Bottom Layer "24VMCU2_L02_P427" (solid, remove dead copper, pour order 427): 13.6,-41.118 9,-41.118 9,-29.118 13.6,-29.118
MCUGND on Bottom Layer "MCUGND_L02_P426" (solid, remove dead copper, pour order 426): 17,-35.518 14,-35.518 14,-29.118 17,-29.118
com11 on Bottom Layer "COM11_L02_P421" (solid, remove dead copper, pour order 421): 23.1,-35.618 20.1,-35.618 20.1,-29.118 23.1,-29.118
24vMCU2 on Bottom Layer "24VMCU2_L02_P420" (solid, remove dead copper, pour order 420): 28.1,-41.118 23.5,-41.118 23.5,-29.118 28.1,-29.118
MCUGND on Bottom Layer "MCUGND_L02_P419" (solid, remove dead copper, pour order 419): 31.5,-35.518 28.5,-35.518 28.5,-29.118 31.5,-29.118
com10 on Bottom Layer "COM10_L02_P414" (solid, remove dead copper, pour order 414): 37.6,-35.618 34.6,-35.618 34.6,-29.118 37.6,-29.118
24vMCU2 on Bottom Layer "24VMCU2_L02_P413" (solid, remove dead copper, pour order 413): 42.6,-41.118 38,-41.118 38,-29.118 42.6,-29.118
MCUGND on Bottom Layer "MCUGND_L02_P412" (solid, remove dead copper, pour order 412): 46,-35.518 43,-35.518 43,-29.118 46,-29.118
com9 on Bottom Layer "COM9_L02_P407" (solid, remove dead copper, pour order 407): 52.1,-35.618 49.1,-35.618 49.1,-29.118 52.1,-29.118
24vMCU2 on Bottom Layer "24VMCU2_L02_P406" (solid, remove dead copper, pour order 406): 57.1,-41.118 52.5,-41.118 52.5,-29.118 57.1,-29.118
MCUGND on Bottom Layer "MCUGND_L02_P405" (solid, remove dead copper, pour order 405): 60.5,-35.518 57.5,-35.518 57.5,-29.118 60.5,-29.118
com8 on Bottom Layer "COM8_L02_P400" (solid, remove dead copper, pour order 400): 66.6,-35.618 63.6,-35.618 63.6,-29.118 66.6,-29.118
24vMCU2 on Bottom Layer "24VMCU2_L02_P399" (solid, remove dead copper, pour order 399): 71.6,-41.118 67,-41.118 67,-29.118 71.6,-29.118
MCUGND on Bottom Layer "MCUGND_L02_P398" (solid, remove dead copper, pour order 398): 75,-35.518 72,-35.518 72,-29.118 75,-29.118
com7 on Bottom Layer "COM7_L02_P393" (solid, remove dead copper, pour order 393): 72,35.7 75,35.7 75,29.2 72,29.2
24vMCU2 on Bottom Layer "24VMCU2_L02_P392" (solid, remove dead copper, pour order 392): 67,41.2 71.6,41.2 71.6,29.2 67,29.2
MCUGND on Bottom Layer "MCUGND_L02_P391" (solid, remove dead copper, pour order 391): 63.6,35.6 66.6,35.6 66.6,29.2 63.6,29.2
com6 on Bottom Layer "COM6_L02_P386" (solid, remove dead copper, pour order 386): 57.5,35.7 60.5,35.7 60.5,29.2 57.5,29.2
24vMCU2 on Bottom Layer "24VMCU2_L02_P385" (solid, remove dead copper, pour order 385): 52.5,41.2 57.1,41.2 57.1,29.2 52.5,29.2
MCUGND on Bottom Layer "MCUGND_L02_P384" (solid, remove dead copper, pour order 384): 49.1,35.6 52.1,35.6 52.1,29.2 49.1,29.2
com5 on Bottom Layer "COM5_L02_P379" (solid, remove dead copper, pour order 379): 43,35.7 46,35.7 46,29.2 43,29.2
24vMCU2 on Bottom Layer "24VMCU2_L02_P378" (solid, remove dead copper, pour order 378): 38,41.2 42.6,41.2 42.6,29.2 38,29.2
MCUGND on Bottom Layer "MCUGND_L02_P377" (solid, remove dead copper, pour order 377): 34.6,35.6 37.6,35.6 37.6,29.2 34.6,29.2
com4 on Bottom Layer "COM4_L02_P372" (solid, remove dead copper, pour order 372): 28.5,35.7 31.5,35.7 31.5,29.2 28.5,29.2
24vMCU2 on Bottom Layer "24VMCU2_L02_P371" (solid, remove dead copper, pour order 371): 23.5,41.2 28.1,41.2 28.1,29.2 23.5,29.2
MCUGND on Bottom Layer "MCUGND_L02_P370" (solid, remove dead copper, pour order 370): 20.1,35.6 23.1,35.6 23.1,29.2 20.1,29.2
com3 on Bottom Layer "COM3_L02_P365" (solid, remove dead copper, pour order 365): 14,35.7 17,35.7 17,29.2 14,29.2
24vMCU2 on Bottom Layer "24VMCU2_L02_P364" (solid, remove dead copper, pour order 364): 9,41.2 13.6,41.2 13.6,29.2 9,29.2
MCUGND on Bottom Layer "MCUGND_L02_P363" (solid, remove dead copper, pour order 363): 5.6,35.6 8.6,35.6 8.6,29.2 5.6,29.2
com2 on Bottom Layer "COM2_L02_P358" (solid, remove dead copper, pour order 358): -0.5,35.7 2.5,35.7 2.5,29.2 -0.5,29.2
24vMCU2 on Bottom Layer "24VMCU2_L02_P357" (solid, remove dead copper, pour order 357): -5.5,41.2 -0.9,41.2 -0.9,29.2 -5.5,29.2
MCUGND on Bottom Layer "MCUGND_L02_P356" (solid, remove dead copper, pour order 356): -8.9,35.6 -5.9,35.6 -5.9,29.2 -8.9,29.2
com1 on Bottom Layer "COM1_L02_P351" (solid, remove dead copper, pour order 351): -15,35.7 -12,35.7 -12,29.2 -15,29.2
24vMCU2 on Bottom Layer "24VMCU2_L02_P350" (solid, remove dead copper, pour order 350): -20,41.2 -15.4,41.2 -15.4,29.2 -20,29.2
MCUGND on Bottom Layer "MCUGND_L02_P349" (solid, remove dead copper, pour order 349): -23.4,35.6 -20.4,35.6 -20.4,29.2 -23.4,29.2
24vMCU2 on Bottom Layer "NONET_L01_P-001" (solid, remove dead copper, pour order 340): -25,29.2 -27.7,26.5 -52.4,26.5 -57.7,21.2 -59.8,21.2 -59.8,24.2 -54.8,29.2 -28.2,29.2 -25.4,32 -25,32
MGND on Bottom Layer "MGND_L02_P256" (solid, remove dead copper, pour order 256): -33.6,42.5 -33.6,32.1 -30.6,32.1 -30.6,42.5
NetJ47_1 on Bottom Layer "NETJ47_1_L02_P261" (solid, remove dead copper, pour order 261): -57.2,42.5 -57.2,32.1 -54.2,32.1 -54.2,42.5
NetJ47_2 on Bottom Layer "NETJ47_2_L02_P260" (solid, remove dead copper, pour order 260): -53,42.5 -53,32.1 -50,32.1 -50,42.5
MGND on Bottom Layer "MGND_L02_P262" (solid, remove dead copper, pour order 262): -48.8,42.5 -48.8,32.1 -42.9,32.1 -42.9,42.5
NetJ48_1 on Bottom Layer "NETJ48_1_L02_P255" (solid, remove dead copper, pour order 255): -42,42.5 -42,32.1 -39,32.1 -39,42.5
NetJ48_2 on Bottom Layer "NETJ48_2_L02_P254" (solid, remove dead copper, pour order 254): -37.8,42.5 -37.8,32.1 -34.8,32.1 -34.8,42.5
MCUGND on Bottom Layer "MCUGND_L02_P213" (solid, remove dead copper, pour order 213): -75.1,42.4 -75.1,37 -62.5,37 -62.5,27 -58.7,27 -58.7,42.4
5vMCU on Bottom Layer "5VMCU_L02_P217" (solid, remove dead copper, pour order 217): -70.3,12.1 -70.3,1.3 -65.5,1.3 -65.5,12.1
MCUGND on Bottom Layer "MCUGND_L02_P218" (solid, remove dead copper, pour order 218): -70,42.4 -70,37.3 -75.2,37.3 -75.2,21.2 -73.6,21.2 -73.6,13.9 -71.9,13.9 -71.9,1.3 -79,1.3 -79,42.4
NetC58_2 on Bottom Layer "NETC58_2_L02_P216" (solid, remove dead copper, pour order 216): -63.1,13.6 -63.1,5.4 -58.3,5.4 -58.3,13.6
24vMCU2 on Bottom Layer "24VMCU2_L02_P215" (solid, remove dead copper, pour order 215): -75.2,26.6 -68,26.6 -68,22.3 -68.6,22.3 -68.6,15.2 -65.2,15.2 -65.2,13.9 -72,13.9 -72,21.2 -75.2,21.2
NetD43_2 on Bottom Layer "NETD43_2_L02_P214" (solid, remove dead copper, pour order 214): -63.6,29.1 -63.6,26.9 -75.2,26.9 -75.2,32 -70,32 -70,29.1
Pin on Bottom Layer "PIN_L02_P212" (solid, remove dead copper, pour order 212): -75.2,33.1 -75.2,37 -62.9,37 -62.9,32.3 -75.2,32.3

## Keep-outs
Keep-Out Layer:
  the board outline again, w0.254

## Other copper
Top Layer:
  pour cut-out: 62.6,-21 67,-21 67,-18.6 62.6,-18.6
  pour cut-out: 48.1,-21 52.5,-21 52.5,-18.6 48.1,-18.6
  pour cut-out: 33.6,-21 38,-21 38,-18.6 33.6,-18.6
  pour cut-out: 19.1,-21 23.5,-21 23.5,-18.6 19.1,-18.6
  pour cut-out: 4.6,-21 9,-21 9,-18.6 4.6,-18.6
  pour cut-out: -9.9,-21 -5.5,-21 -5.5,-18.6 -9.9,-18.6
  pour cut-out: -24.4,-21 -20,-21 -20,-18.6 -24.4,-18.6
  pour cut-out: -11,21.1 -15.4,21.1 -15.4,18.7 -11,18.7
  pour cut-out: 3.5,21.1 -0.9,21.1 -0.9,18.7 3.5,18.7
  pour cut-out: 18,21.1 13.6,21.1 13.6,18.7 18,18.7
  pour cut-out: 32.5,21.1 28.1,21.1 28.1,18.7 32.5,18.7
  pour cut-out: 47,21.1 42.6,21.1 42.6,18.7 47,18.7
  pour cut-out: 76,21.1 71.6,21.1 71.6,18.7 76,18.7
  pour cut-out: 61.5,21.1 57.1,21.1 57.1,18.7 61.5,18.7
  pour cut-out: -42.3,-24.2 -42.3,-22.9 -54.3,-22.9 -54.3,-24.2
  pour cut-out: -54.3,-7.8 -54.3,-9.1 -42.3,-9.1 -42.3,-7.8
  pour cut-out: -56.5,-22 -55.2,-22 -55.2,-10 -56.5,-10
  pour cut-out: -40.1,-10 -41.4,-10 -41.4,-22 -40.1,-22
Bottom Layer:
  pour cut-out: -67.025,10.6 -67.025,7.2 -61.575,7.2 -61.575,10.6
  pour cut-out: -42.3,-24.2 -42.3,-22.9 -54.3,-22.9 -54.3,-24.2
  pour cut-out: -40.1,-10 -41.4,-10 -41.4,-22 -40.1,-22
  pour cut-out: -54.3,-7.8 -54.3,-9.1 -42.3,-9.1 -42.3,-7.8
  pour cut-out: -56.5,-22 -55.2,-22 -55.2,-10 -56.5,-10

## Silkscreen, mask and mechanical layers (free items; w line width, h text height)
Top Overlay:
  lines w0.2: 47.4,-6.2 57.4,-6.2 ; 47.4,-2 57.4,-2 ; 47.4,-1.6 46.3,-1.6 46.3,1.8 47.4,1.8 ; 47.4,2.2 57.4,2.2 ; 47.4,6.4 57.4,6.4 ; 51,2.2 52.4,3.6 ; 51,6.4 52.4,5 ; 52.4,-6.9 52.4,7.1 ; 56,-6.2 57.4,-4.8 ; 56,2.2 57.4,0.8 ; 57.4,-3.4 56,-2 57.4,-0.6 ; 47.4,-6.9 57.4,-6.9 57.4,7.1 47.4,7.1 47.4,-6.9
  text "GND" at 60.454,4.454 h1.52
  text "GND" at 37.854,3.554 h1.52
  text "24V-OUT" at 60.554,-0.446 h1.52
  text "LED+" at 37.554,-0.546 h1.52
  text "BOOT" at -74.046,-3.646 h1.52
  text "LED-" at 37.554,-5.646 h1.52
  text "COM-SIGNAL" at 60.454,-6.146 h1.52
  text "Mode" at -73.946,-11.746 h1.52
  text "GND" at -70.25,-17.5 h0.8
  text "MOSI" at -70.25,-20 h0.8
  text "MISO" at -70.25,-22.5 h0.8
  text "SCK" at -70.25,-25 h0.8
  text "GND" at -70.25,-32 h0.8
  text "CLK" at -70.25,-34.5 h0.8
  text "3v3" at -39.7,-34.95 h0.8 r90
  text "GND" at -47.05,-35.1 h0.8 r90
  text "RX" at -44.6,-35.1 h0.8 r90
  text "TX" at -42.15,-35.1 h0.8 r90
  text "IO" at -70.25,-37 h0.8
  text "3v3" at -70.25,-39.5 h0.8
Top Solder:
  circle w1.5: c84,16.5 r0.75
  circle w1.5: c84,-16.5 r0.75
  circle w1.5: c-84,16.5 r0.75
  circle w1.5: c-84,-16.5 r0.75
Bottom Solder:
  circle w1.5: c84,16.5 r0.75
  circle w1.5: c84,-16.5 r0.75
  circle w1.5: c-84,16.5 r0.75
  circle w1.5: c-84,-16.5 r0.75
Mechanical 1:
  the board outline again, w0.254

## Text inside footprints (layer, text, board x,y; h text height)
J46: Mechanical 13 "PCB EDGE" at -54.29,-42.98 h0.8 r180
RAMON1: Top Overlay "www.ramonic.com" at -53.05,-1.95 h2
RAMON2: Bottom Overlay "www.ramonic.com" at -34.45,15.25 h2